# Altium PCB macropad.PcbDoc
Units mm, origin at the board's own origin, x right, y up, seen from the top; angles counter-clockwise.
Board outline 177.4 x 121.16 mm, 2 copper layers (F.Cu, B.Cu); 12 components, 52 nets, 137 pads, 0 vias.
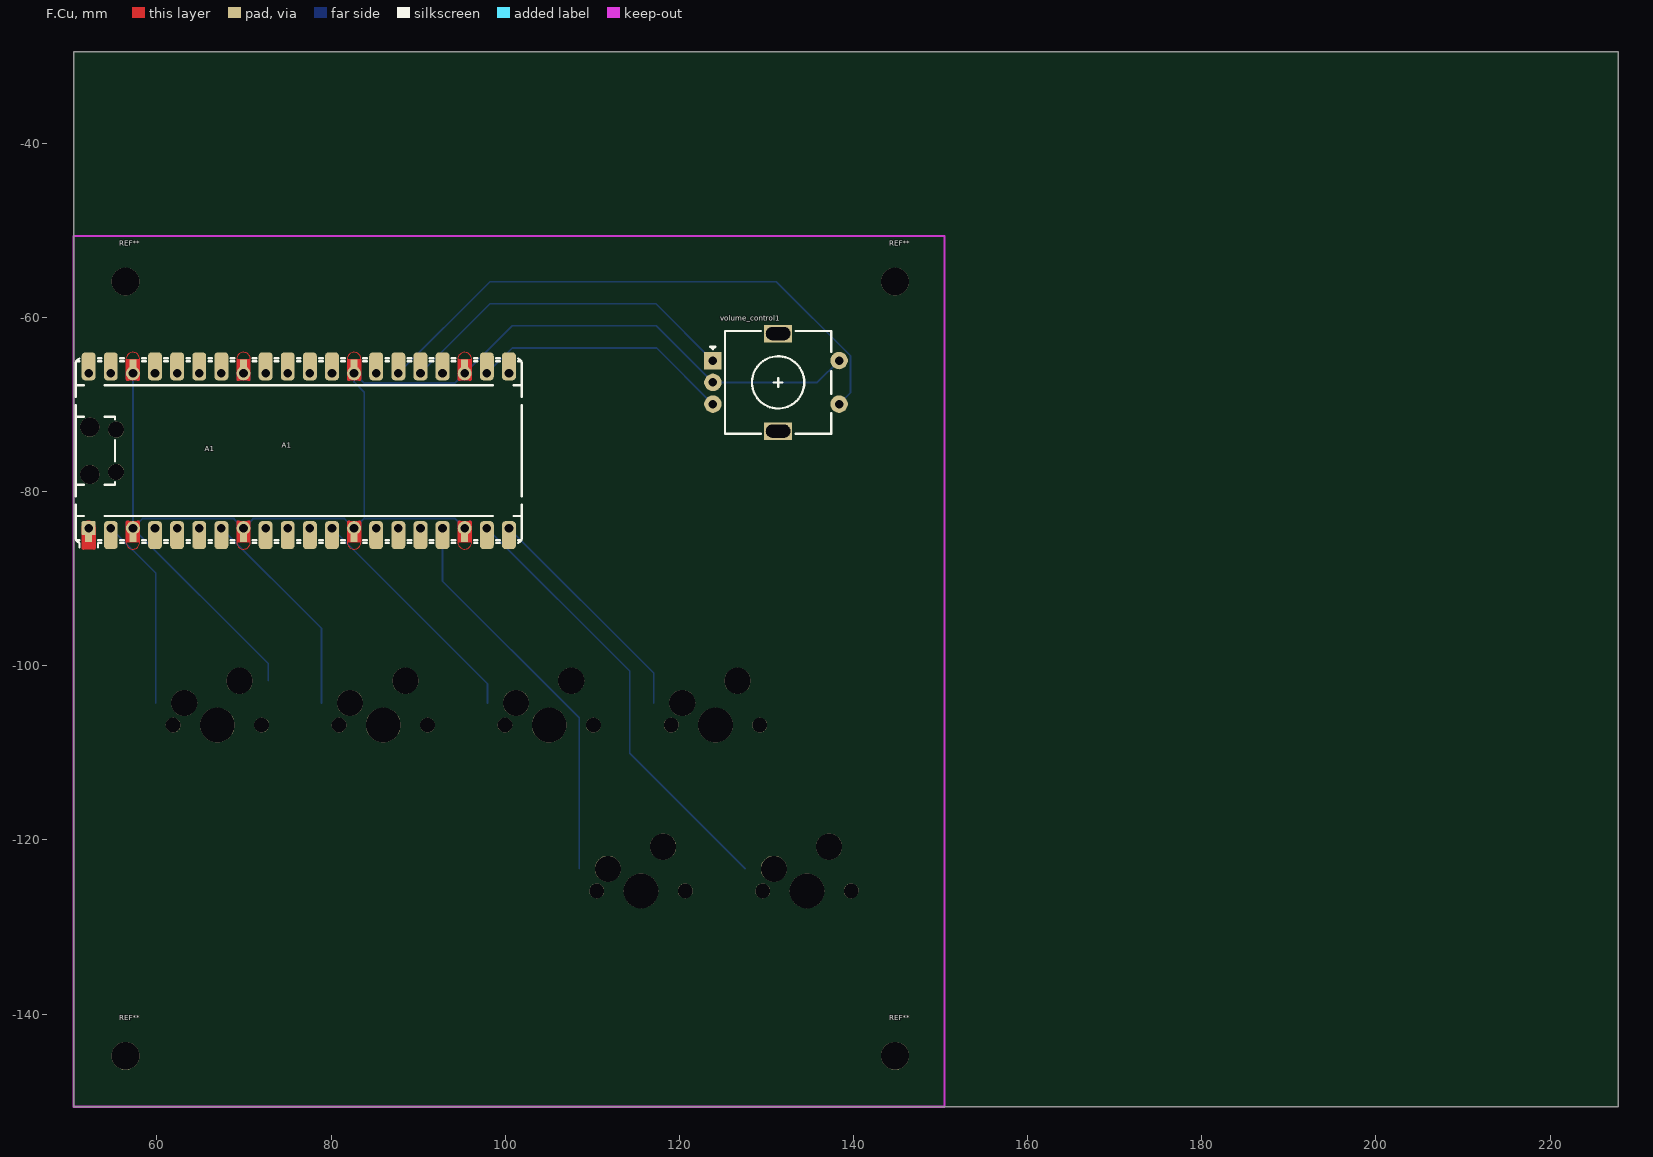
[diagram p0: F.Cu view]
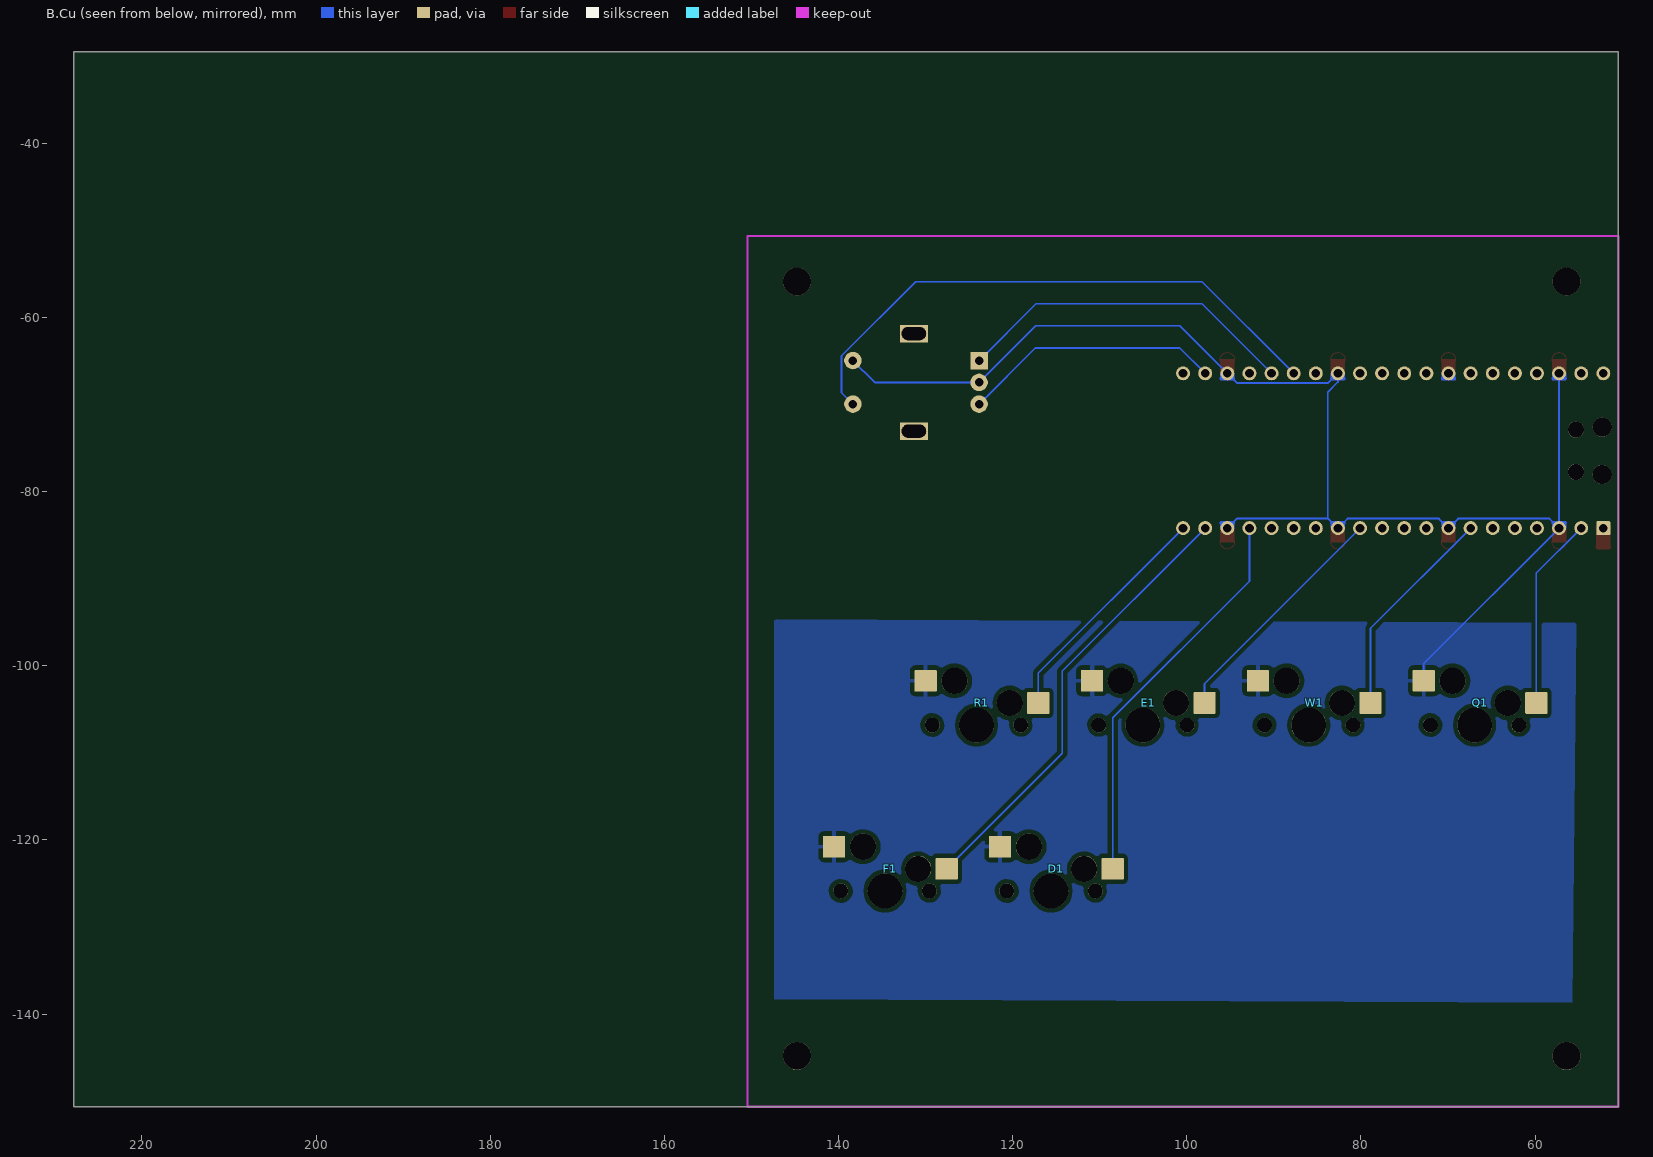
[diagram p1: B.Cu view, seen from below]

## Layer stack, top to bottom
F.Mask: solder mask 0.0102, Solder Resist, Dk 3.5
F.Cu: signal copper 0.0356
Dielectric 1: dielectric 0.32, FR-4, Dk 4.8
B.Cu: signal copper 0.0356
B.Mask: solder mask 0.0102, Solder Resist, Dk 3.5

## Board outline
100.475,-150.622 50.44,-150.622 50.44,-29.464 227.838,-29.464 227.838,-150.622

## Design rules (kind name [scope] priority, off if disabled: settings)
Clearance "Clearence 0.5_Polygon" [InNamedPolygon('B.Cu-GND')] p1: gap=0.5 ignorepadtopadclearanceinfootprint=FALSE
Clearance "Clearence 0.2_NetClass" [InNetClass('Default')] p2: gap=0.2 ignorepadtopadclearanceinfootprint=FALSE
MinimumSolderMaskSliver [All] p1: minsoldermaskwidth=0
PolygonConnect Polygon_B.Cu-GND_ConnectDirect [IsNamedPolygon('B.Cu-GND') vs IsVia] p1: connectstyle=Direct reliefconductorwidth=0.254 reliefentries=4 polygonreliefangle="90 Angle" airgapwidth=0.254
PolygonConnect Polygon_B.Cu-GND_ConnectRelief45 [IsNamedPolygon('B.Cu-GND') vs (IsThruPin or IsSMTPin) and (PadShape_AllLayers = 'Round')] p2: connectstyle=Relief reliefconductorwidth=0.5 reliefentries=4 polygonreliefangle="45 Angle" airgapwidth=0.5
PolygonConnect Polygon_B.Cu-GND_ConnectRelief90 [IsNamedPolygon('B.Cu-GND') vs (IsThruPin or IsSMTPin) and (PadShape_AllLayers <> 'Round')] p3: connectstyle=Relief reliefconductorwidth=0.5 reliefentries=4 polygonreliefangle="90 Angle" airgapwidth=0.5
RoutingVias [All] p1: holewidth=0.711 width=1.27 viastyle="Through Hole" minholewidth=0.711 minwidth=1.27 maxholewidth=0.711 maxwidth=1.27
SilkToSilkClearance [All] p1: silktosilkclearance=0
SilkToSolderMaskClearance [IsPad] p1: minsilkscreentomaskgap=0 clearancetoexposedcopper=TRUE
SolderMaskExpansion [All] p1: expansion=0 istentingtop=FALSE
Width [All] p1: maxlimit=10 minlimit=0.254 preferedwidth=0.254 toplayer_maxwidth=0.254 bottomlayer_prefwidth=0.2 minimp=50.000000 maximp=50.000000 favimp=50.000000
27 further rules are at their usual default settings.

## Classes and differential pairs
net class Default: GND Net-(A1-GPIO9) Net-(A1-GPIO13) Net-(A1-GPIO14) Net-(A1-GPIO15) Net-(A1-GPIO17) Net-(A1-GPIO19) Net-(A1-GPIO20) unconnected-(A1-3V3-Pad36) unconnected-(A1-3V3_EN-Pad37) unconnected-(A1-ADC_VREF-Pad35) unconnected-(A1-ADC_VREF-Pad35)_1 unconnected-(A1-AGND-Pad33) unconnected-(A1-GPIO0-Pad1) unconnected-(A1-GPIO0-Pad1)_1 unconnected-(A1-GPIO1-Pad2) unconnected-(A1-GPIO2-Pad4) unconnected-(A1-GPIO2-Pad4)_1 unconnected-(A1-GPIO3-Pad5) unconnected-(A1-GPIO3-Pad5)_1 unconnected-(A1-GPIO4-Pad6) unconnected-(A1-GPIO4-Pad6)_1 unconnected-(A1-GPIO5-Pad7) unconnected-(A1-GPIO6-Pad9) unconnected-(A1-GPIO6-Pad9)_1 unconnected-(A1-GPIO7-Pad10) unconnected-(A1-GPIO7-Pad10)_1 unconnected-(A1-GPIO8-Pad11) unconnected-(A1-GPIO8-Pad11)_1 unconnected-(A1-GPIO10-Pad14) unconnected-(A1-GPIO10-Pad14)_1 unconnected-(A1-GPIO11-Pad15) unconnected-(A1-GPIO11-Pad15)_1 unconnected-(A1-GPIO12-Pad16) unconnected-(A1-GPIO12-Pad16)_1 unconnected-(A1-GPIO16-Pad21) unconnected-(A1-GPIO16-Pad21)_1 unconnected-(A1-GPIO18-Pad24) unconnected-(A1-GPIO18-Pad24)_1 unconnected-(A1-GPIO21-Pad27) unconnected-(A1-GPIO21-Pad27)_1 unconnected-(A1-GPIO22-Pad29) unconnected-(A1-GPIO22-Pad29)_1 unconnected-(A1-GPIO26_ADC0-Pad31) unconnected-(A1-GPIO26_ADC0-Pad31)_1 unconnected-(A1-GPIO27_ADC1-Pad32) unconnected-(A1-GPIO27_ADC1-Pad32)_1 unconnected-(A1-GPIO28_ADC2-Pad34) unconnected-(A1-GPIO28_ADC2-Pad34)_1 unconnected-(A1-RUN-Pad30) unconnected-(A1-VBUS-Pad40) unconnected-(A1-VSYS-Pad39)

## Components (designator, comment, footprint, x,y, rotation, side; value= is the part's Value field where it differs from the comment)
A1 "Comment" RaspberryPi_Pico_Common_Unspecified 76.3,-75.3 r90 top value=RaspberryPi_Pico
D1 "Comment" MX-Hotswap-1U 115.6,-125.85 r0 bottom value=SW_Push
E1 "Comment" MX-Hotswap-1U 105.05,-106.8 r0 bottom value=SW_Push
F1 "Comment" MX-Hotswap-1U 134.66,-125.85 r0 bottom value=SW_Push
Q1 "Comment" MX-Hotswap-1U 66.95,-106.8 r0 bottom value=SW_Push
R1 "Comment" MX-Hotswap-1U 124.15,-106.8 r0 bottom value=SW_Push
REF** "Comment" MountingHole_3.2mm_M3 56.4,-55.88 r0 top value=MountingHole_3.2mm_M3
REF** "Comment" MountingHole_3.2mm_M3 144.78,-144.78 r0 top value=MountingHole_3.2mm_M3
REF** "Comment" MountingHole_3.2mm_M3 144.78,-55.88 r0 top value=MountingHole_3.2mm_M3
REF** "Comment" MountingHole_3.2mm_M3 56.4,-144.78 r0 top value=MountingHole_3.2mm_M3
volume_control1 "Comment" RotaryEncoder_Alps_EC11E-Switch_Vertical_H20mm 123.85,-64.95 r0 top value=RotaryEncoder_Switch
W1 "Comment" MX-Hotswap-1U 86,-106.8 r0 bottom value=SW_Push

## Footprints (in the part's own frame and the unit in brackets; to place one, negate y for a bottom-side part, rotate by r counter-clockwise, add the part's x,y. Pads: shape width x height; smd on the part's side, far side on the other; paste and mask are expansions set on the pad)
MountingHole_3.2mm_M3 [mm]
  round 3.2 hole 3.2 paste-2539.97 mask+0: Un1(0,0)
MX-Hotswap-1U [mm]
  rrect8% 2.55x2.5 smd mask+0: 1(-7.085,-2.54) 2(5.842,-5.08)
  round 1.702 hole 1.702 paste-2539.97 mask+0: Un1(5.08,0) Un5(-5.08,0)
  round 3 hole 3 paste-2539.97 mask+0: Un2(2.54,-5.08) Un4(-3.81,-2.54)
  round 3.988 hole 3.988 paste-2539.97 mask+0: Un3(0,0)
RaspberryPi_Pico_Common_Unspecified [mm]
  rect 1.6x0.8 smd paste-1.6 mask+0: 1(-9.69,24.13) 3(-9.69,19.05) 8(-9.69,6.35) 13(-9.69,-6.35) 18(-9.69,-19.05) 23(9.69,-19.05) 28(9.69,-6.35) 33(9.69,6.35) 38(9.69,19.05)
  rrect12% 1.6x1.6 hole 1 paste-2539.97 mask+0: 1(-8.89,24.13)
  rrect50% 3.2x1.6 smd paste-3.2 mask+0: 2(-9.69,21.59) 4(-9.69,16.51) 5(-9.69,13.97) 6(-9.69,11.43) 7(-9.69,8.89) 9(-9.69,3.81) 10(-9.69,1.27) 11(-9.69,-1.27) 12(-9.69,-3.81) 14(-9.69,-8.89) 15(-9.69,-11.43) 16(-9.69,-13.97) 17(-9.69,-16.51) 19(-9.69,-21.59) 20(-9.69,-24.13) 21(9.69,-24.13) 22(9.69,-21.59) 24(9.69,-16.51) 25(9.69,-13.97) 26(9.69,-11.43) 27(9.69,-8.89) 29(9.69,-3.81) 30(9.69,-1.27) 31(9.69,1.27) 32(9.69,3.81) 34(9.69,8.89) 35(9.69,11.43) 36(9.69,13.97) 37(9.69,16.51) 39(9.69,21.59) 40(9.69,24.13)
  round 1.6 hole 1 paste-2539.97 mask+0: 2(-8.89,21.59) 3(-8.89,19.05) 4(-8.89,16.51) 5(-8.89,13.97) 6(-8.89,11.43) 7(-8.89,8.89) 8(-8.89,6.35) 9(-8.89,3.81) 10(-8.89,1.27) 11(-8.89,-1.27) 12(-8.89,-3.81) 13(-8.89,-6.35) 14(-8.89,-8.89) 15(-8.89,-11.43) 16(-8.89,-13.97) 17(-8.89,-16.51) 18(-8.89,-19.05) 19(-8.89,-21.59) 20(-8.89,-24.13) 21(8.89,-24.13) 22(8.89,-21.59) 23(8.89,-19.05) 24(8.89,-16.51) 25(8.89,-13.97) 26(8.89,-11.43) 27(8.89,-8.89) 28(8.89,-6.35) 29(8.89,-3.81) 30(8.89,-1.27) 31(8.89,1.27) 32(8.89,3.81) 33(8.89,6.35) 34(8.89,8.89) 35(8.89,11.43) 36(8.89,13.97) 37(8.89,16.51) 38(8.89,19.05) 39(8.89,21.59) 40(8.89,24.13)
  round 2.2 hole 2.2 paste-2539.97 mask+0: Un1(-2.725,24) Un4(2.725,24)
  round 1.85 hole 1.85 paste-2539.97 mask+0: Un2(-2.425,20.97) Un3(2.425,20.97)
  F.Cu circle w0: c8.29,18.45 r0.2
  F.Cu circle w0: c8.29,19.65 r0.2
  F.Cu circle w0: c10.49,19.05 r0.8
  F.Cu circle w0: c8.29,19.65 r0.2
  F.Cu circle w0: c8.29,18.45 r0.2
  F.Cu circle w0: c8.29,5.75 r0.2
  F.Cu circle w0: c8.29,6.95 r0.2
  F.Cu circle w0: c10.49,6.35 r0.8
  F.Cu circle w0: c8.29,6.95 r0.2
  F.Cu circle w0: c8.29,5.75 r0.2
  F.Cu circle w0: c8.29,-6.95 r0.2
  F.Cu circle w0: c8.29,-5.75 r0.2
  F.Cu circle w0: c10.49,-6.35 r0.8
  F.Cu circle w0: c8.29,-5.75 r0.2
  F.Cu circle w0: c8.29,-6.95 r0.2
  F.Cu circle w0: c8.29,-19.65 r0.2
  F.Cu circle w0: c8.29,-18.45 r0.2
  F.Cu circle w0: c10.49,-19.05 r0.8
  F.Cu circle w0: c8.29,-18.45 r0.2
  F.Cu circle w0: c8.29,-19.65 r0.2
  F.Cu circle w0: c-8.29,-18.45 r0.2
  F.Cu circle w0: c-8.29,-19.65 r0.2
  F.Cu circle w0: c-8.29,-19.65 r0.2
  F.Cu circle w0: c-8.29,-18.45 r0.2
  F.Cu circle w0: c-10.49,-19.05 r0.8
  F.Cu circle w0: c-8.29,-5.75 r0.2
  F.Cu circle w0: c-8.29,-6.95 r0.2
  F.Cu circle w0: c-8.29,-6.95 r0.2
  F.Cu circle w0: c-8.29,-5.75 r0.2
  F.Cu circle w0: c-10.49,-6.35 r0.8
  F.Cu circle w0: c-8.29,6.95 r0.2
  F.Cu circle w0: c-8.29,5.75 r0.2
  F.Cu circle w0: c-8.29,5.75 r0.2
  F.Cu circle w0: c-8.29,6.95 r0.2
  F.Cu circle w0: c-10.49,6.35 r0.8
  F.Cu circle w0: c-8.29,19.65 r0.2
  F.Cu circle w0: c-8.29,18.45 r0.2
  F.Cu circle w0: c-8.29,18.45 r0.2
  F.Cu circle w0: c-8.29,19.65 r0.2
  F.Cu circle w0: c-10.49,19.05 r0.8
  F.Cu circle w0: c-11.09,23.53 r0.2
  F.Cu circle w0: c-11.09,24.73 r0.2
  F.Cu circle w0: c-8.89,24.13 r0.8
  F.Cu region: 10.49,18.25 8.29,18.25 8.09,18.45 8.09,19.65 8.29,19.85 10.49,19.85
  F.Cu region: 8.89,18.25 8.29,18.25 8.09,18.45 8.09,19.65 8.29,19.85 8.89,19.85
  F.Cu region: 10.49,5.55 8.29,5.55 8.09,5.75 8.09,6.95 8.29,7.15 10.49,7.15
  F.Cu region: 8.89,5.55 8.29,5.55 8.09,5.75 8.09,6.95 8.29,7.15 8.89,7.15
  F.Cu region: 10.49,-7.15 8.29,-7.15 8.09,-6.95 8.09,-5.75 8.29,-5.55 10.49,-5.55
  F.Cu region: 8.89,-7.15 8.29,-7.15 8.09,-6.95 8.09,-5.75 8.29,-5.55 8.89,-5.55
  F.Cu region: 10.49,-19.85 8.29,-19.85 8.09,-19.65 8.09,-18.45 8.29,-18.25 10.49,-18.25
  F.Cu region: 8.89,-19.85 8.29,-19.85 8.09,-19.65 8.09,-18.45 8.29,-18.25 8.89,-18.25
  F.Cu region: -8.09,-18.45 -8.09,-19.65 -8.29,-19.85 -8.89,-19.85 -8.89,-18.25 -8.29,-18.25
  F.Cu region: -8.09,-18.45 -8.09,-19.65 -8.29,-19.85 -10.49,-19.85 -10.49,-18.25 -8.29,-18.25
  F.Cu region: -8.09,-5.75 -8.09,-6.95 -8.29,-7.15 -8.89,-7.15 -8.89,-5.55 -8.29,-5.55
  F.Cu region: -8.09,-5.75 -8.09,-6.95 -8.29,-7.15 -10.49,-7.15 -10.49,-5.55 -8.29,-5.55
  F.Cu region: -8.09,6.95 -8.09,5.75 -8.29,5.55 -8.89,5.55 -8.89,7.15 -8.29,7.15
  F.Cu region: -8.09,6.95 -8.09,5.75 -8.29,5.55 -10.49,5.55 -10.49,7.15 -8.29,7.15
  F.Cu region: -8.09,19.65 -8.09,18.45 -8.29,18.25 -8.89,18.25 -8.89,19.85 -8.29,19.85
  F.Cu region: -8.09,19.65 -8.09,18.45 -8.29,18.25 -10.49,18.25 -10.49,19.85 -8.29,19.85
  F.Cu region: -8.89,23.33 -11.09,23.33 -11.29,23.53 -11.29,24.73 -11.09,24.93 -8.89,24.93
  B.Cu circle w0: c8.29,19.65 r0.2
  B.Cu circle w0: c8.29,18.45 r0.2
  B.Cu circle w0: c8.29,6.95 r0.2
  B.Cu circle w0: c8.29,5.75 r0.2
  B.Cu circle w0: c8.29,-5.75 r0.2
  B.Cu circle w0: c8.29,-6.95 r0.2
  B.Cu circle w0: c8.29,-18.45 r0.2
  B.Cu circle w0: c8.29,-19.65 r0.2
  B.Cu circle w0: c-8.29,-18.45 r0.2
  B.Cu circle w0: c-8.29,-19.65 r0.2
  B.Cu circle w0: c-8.29,-5.75 r0.2
  B.Cu circle w0: c-8.29,-6.95 r0.2
  B.Cu circle w0: c-8.29,6.95 r0.2
  B.Cu circle w0: c-8.29,5.75 r0.2
  B.Cu circle w0: c-8.29,19.65 r0.2
  B.Cu circle w0: c-8.29,18.45 r0.2
  B.Cu region: 8.89,18.25 8.29,18.25 8.09,18.45 8.09,19.65 8.29,19.85 8.89,19.85
  B.Cu region: 8.89,5.55 8.29,5.55 8.09,5.75 8.09,6.95 8.29,7.15 8.89,7.15
  B.Cu region: 8.89,-7.15 8.29,-7.15 8.09,-6.95 8.09,-5.75 8.29,-5.55 8.89,-5.55
  B.Cu region: 8.89,-19.85 8.29,-19.85 8.09,-19.65 8.09,-18.45 8.29,-18.25 8.89,-18.25
  B.Cu region: -8.09,-18.45 -8.09,-19.65 -8.29,-19.85 -8.89,-19.85 -8.89,-18.25 -8.29,-18.25
  B.Cu region: -8.09,-5.75 -8.09,-6.95 -8.29,-7.15 -8.89,-7.15 -8.89,-5.55 -8.29,-5.55
  B.Cu region: -8.09,6.95 -8.09,5.75 -8.29,5.55 -8.89,5.55 -8.89,7.15 -8.29,7.15
  B.Cu region: -8.09,19.65 -8.09,18.45 -8.29,18.25 -8.89,18.25 -8.89,19.85 -8.29,19.85
  silkscreen extent -11.09,-25.61 10.61,25.61
RotaryEncoder_Alps_EC11E-Switch_Vertical_H20mm [mm]
  rect 2x2 hole 1 paste-2539.97 mask+0: A(0,0)
  round 2 hole 1 paste-2539.97 mask+0: B(0,-5) C(0,-2.5) S1(14.5,-5) S2(14.5,0)
  rect 3.2x2 hole 1.5 slot 2.8 at 0 deg paste-2539.97 mask+0: MP(7.5,-8.1) MP(7.5,3.1)
  silkscreen extent -0.3,-8.4 13.6,3.4

## Part data
A1: library part RaspberryPi_Pico_Common_Unspecified, "Raspberry Pi Pico versatile common (Pico & Pico W) footprint for surface-mount or through-hole hand soldering, supports Raspberry Pi Pico 2, default socketed model has height of 8.51mm, https://datasheets.raspberrypi.com/pico/pico-datasheet.pdf", Datasheet=https://datasheets.raspberrypi.com/pico/pico-datasheet.pdf, Description="Versatile and inexpensive microcontroller module powered by RP2040 dual-core Arm Cortex-M0+ processor up to 133 MHz, 264kB SRAM, 2MB QSPI flash; also supports Raspberry Pi Pico 2", ki_fp_filters="RaspberryPi?Pico?Common* RaspberryPi?Pico?SMD*"
D1 E1 F1 Q1 R1 W1: library part MX-Hotswap-1U, Description="Push button switch, generic, two pins"
REF** REF** REF** REF**: library part MountingHole_3.2mm_M3, "Mounting Hole 3.2mm, M3, no annular, generated by kicad-footprint-generator mountinghole.py", KiLib_Generator=mounting_hardware/mounting_hole
volume_control1: library part RotaryEncoder_Alps_EC11E-Switch_Vertical_H20mm, "Alps rotary encoder, EC11E... with switch, vertical shaft, http://www.alps.com/prod/info/E/HTML/Encoder/Incremental/EC11/EC11E15204A3.html", Description="Rotary encoder, dual channel, incremental quadrate outputs, with switch", ki_fp_filters=RotaryEncoder*Switch*

## Nets (pads, with @x,y where several pads share a name; then routed paths per layer and width w, separated by ;. In a path a pad name is that pad's centre, name@x,y a point inside that pad or via, vN(x,y) a via of type N, cw(c..) or ccw(c..) an arc to the next point about the centre after c; other vN are vias at no path point)
GND: A1.3 A1.8 A1.13 A1.18 A1.23 A1.28 A1.38 D1.2 E1.2 F1.2 Q1.2 R1.2 volume_control1.C volume_control1.S2 W1.2 | length 164.1
  B.Cu w0.2: A1.38@57.25,-66.41 A1.3@57.25,-84.19 ; Q1.2 72.792,-99.732 A1.3@57.25,-84.19 ; A1.18@95.35,-84.19 94.25,-83.09 83.75,-83.09 ; volume_control1.C@123.79,-67.51 volume_control1.C ; volume_control1.S2 135.85,-67.45 volume_control1.C ; A1.3@57.25,-84.19 58.35,-83.09 68.85,-83.09 69.95,-84.19 71.05,-83.09 81.55,-83.09 A1.13@82.65,-84.19 ; A1.13@82.65,-84.19 83.75,-83.09 ; A1.13@82.65,-84.19 83.82,-83.02 ; 83.75,-83.09 83.82,-83.02 ; 83.82,-83.02 83.82,-68.58 82.65,-67.41 82.65,-66.41 83.75,-67.51 94.25,-67.51 95.35,-66.41 100.8,-60.96 117.36,-60.96 volume_control1.C
Net-(A1-GPIO9): A1.12 E1.1 | length 27.5
  B.Cu w0.2: A1.12@80.11,-84.19 97.965,-102.045 E1.1
Net-(A1-GPIO13): A1.17 D1.1 | length 45.6
  B.Cu w0.2: A1.17@92.81,-84.19 92.81,-90.27 108.515,-105.975 D1.1
Net-(A1-GPIO14): A1.19 F1.1 | length 51.4
  B.Cu w0.2: A1.19@97.89,-84.19 114.3,-100.6 114.3,-110.035 F1.1
Net-(A1-GPIO15): A1.20 R1.1 | length 27
  B.Cu w0.2: A1.20@100.43,-84.19 117.065,-100.825 R1.1
Net-(A1-GPIO17): A1.22 volume_control1.B | length 29.8
  B.Cu w0.2: A1.22@97.89,-66.41 100.8,-63.5 117.4,-63.5 volume_control1.B
Net-(A1-GPIO19): A1.25 volume_control1.A | length 39.6
  B.Cu w0.2: A1.25@90.27,-66.41 98.26,-58.42 117.32,-58.42 volume_control1.A
Net-(A1-GPIO20): A1.26 volume_control1.S1 | length 65.9
  B.Cu w0.2: A1.26@87.73,-66.41 98.26,-55.88 131.118,-55.88 139.65,-64.412 139.65,-68.65 volume_control1.S1
unconnected-(A1-3V3-Pad36): A1.36
unconnected-(A1-3V3_EN-Pad37): A1.37
unconnected-(A1-ADC_VREF-Pad35): A1.35@64.87,-66.41
unconnected-(A1-ADC_VREF-Pad35)_1: A1.35@64.87,-65.61
unconnected-(A1-AGND-Pad33): A1.33
unconnected-(A1-GPIO0-Pad1): A1.1@52.17,-84.99
unconnected-(A1-GPIO0-Pad1)_1: A1.1@52.17,-84.19
unconnected-(A1-GPIO1-Pad2): A1.2 Q1.1 | length 22.2
  B.Cu w0.2: A1.2@54.71,-84.19 59.865,-89.345 Q1.1
unconnected-(A1-GPIO2-Pad4): A1.4@59.79,-84.99
unconnected-(A1-GPIO2-Pad4)_1: A1.4@59.79,-84.19
unconnected-(A1-GPIO3-Pad5): A1.5@62.33,-84.19
unconnected-(A1-GPIO3-Pad5)_1: A1.5@62.33,-84.99
unconnected-(A1-GPIO4-Pad6): A1.6@64.87,-84.99
unconnected-(A1-GPIO4-Pad6)_1: A1.6@64.87,-84.19
unconnected-(A1-GPIO5-Pad7): A1.7 W1.1 | length 24.8
  B.Cu w0.2: A1.7@67.41,-84.19 78.915,-95.695 W1.1
unconnected-(A1-GPIO6-Pad9): A1.9@72.49,-84.99
unconnected-(A1-GPIO6-Pad9)_1: A1.9@72.49,-84.19
unconnected-(A1-GPIO7-Pad10): A1.10@75.03,-84.19
unconnected-(A1-GPIO7-Pad10)_1: A1.10@75.03,-84.99
unconnected-(A1-GPIO8-Pad11): A1.11@77.57,-84.19
unconnected-(A1-GPIO8-Pad11)_1: A1.11@77.57,-84.99
unconnected-(A1-GPIO10-Pad14): A1.14@85.19,-84.19
unconnected-(A1-GPIO10-Pad14)_1: A1.14@85.19,-84.99
unconnected-(A1-GPIO11-Pad15): A1.15@87.73,-84.19
unconnected-(A1-GPIO11-Pad15)_1: A1.15@87.73,-84.99
unconnected-(A1-GPIO12-Pad16): A1.16@90.27,-84.99
unconnected-(A1-GPIO12-Pad16)_1: A1.16@90.27,-84.19
unconnected-(A1-GPIO16-Pad21): A1.21@100.43,-66.41
unconnected-(A1-GPIO16-Pad21)_1: A1.21@100.43,-65.61
unconnected-(A1-GPIO18-Pad24): A1.24@92.81,-66.41
unconnected-(A1-GPIO18-Pad24)_1: A1.24@92.81,-65.61
unconnected-(A1-GPIO21-Pad27): A1.27@85.19,-65.61
unconnected-(A1-GPIO21-Pad27)_1: A1.27@85.19,-66.41
unconnected-(A1-GPIO22-Pad29): A1.29@80.11,-66.41
unconnected-(A1-GPIO22-Pad29)_1: A1.29@80.11,-65.61
unconnected-(A1-GPIO26_ADC0-Pad31): A1.31@75.03,-65.61
unconnected-(A1-GPIO26_ADC0-Pad31)_1: A1.31@75.03,-66.41
unconnected-(A1-GPIO27_ADC1-Pad32): A1.32@72.49,-65.61
unconnected-(A1-GPIO27_ADC1-Pad32)_1: A1.32@72.49,-66.41
unconnected-(A1-GPIO28_ADC2-Pad34): A1.34@67.41,-66.41
unconnected-(A1-GPIO28_ADC2-Pad34)_1: A1.34@67.41,-65.61
unconnected-(A1-RUN-Pad30): A1.30
unconnected-(A1-VBUS-Pad40): A1.40
unconnected-(A1-VSYS-Pad39): A1.39
pads on no net: A1.Un1 A1.Un2 A1.Un3 A1.Un4 D1.Un1 D1.Un2 D1.Un3 D1.Un4 D1.Un5 E1.Un1 E1.Un2 E1.Un3 E1.Un4 E1.Un5 F1.Un1 F1.Un2 F1.Un3 F1.Un4 F1.Un5 Q1.Un1 Q1.Un2 Q1.Un3 Q1.Un4 Q1.Un5 R1.Un1 R1.Un2 R1.Un3 R1.Un4 R1.Un5 REF**.Un1 volume_control1.MP W1.Un1 W1.Un2 W1.Un3 W1.Un4 W1.Un5

## Polygon pours and split planes (outlines as drawn)
GND on B.Cu "B.Cu-GND" (solid, remove dead copper, pour order 0): 55.293,-95.049 147.35,-94.657 147.35,-138.304 55.725,-138.696

## Keep-outs
Edge.Cuts:
  lines w0: 50.44,-150.64 150.44,-150.64 150.44,-50.64 50.44,-50.64 50.44,-150.64
  lines w0.254: 50.44,-150.64 150.44,-150.64 150.44,-50.64 50.44,-50.64 50.44,-150.64

## Silkscreen, mask and mechanical layers (free items; w line width, h text height)
F.SilkS:
  text "A1" at 65.525,-75.579 h1

## Text inside footprints (layer, text, board x,y; h text height)
A1: Cmts.User "Exposed Copper Keep Out" at 100.062,-76.076 h0.33 r90; Cmts.User "Keep Out" at 97.14,-76.116 h1 r90; Cmts.User "Possible Antenna" at 91.656,-77.394 h1 r90; Cmts.User "Exposed Copper Keep Out" at 80.997,-72.952 h0.33 r90; Cmts.User "Out" at 70.9,-74.167 h0.33 r90; Cmts.User "Keep" at 70.295,-74.206 h0.33 r90; Cmts.User "Copper" at 69.662,-74.3 h0.33 r90; Cmts.User "AGND Plane" at 66.837,-70.097 h0.5; Cmts.User "Exposed Copper Keep Out" at 59.878,-77.661 h0.33; Cmts.User "Out" at 54.583,-75.167 h0.33 r90; Cmts.User "Keep" at 53.978,-75.206 h0.33 r90; Cmts.User "Copper" at 51.314,-75.3 h0.33 r90; Cmts.User "Exposed" at 50.678,-75.338 h0.33 r90; Cmts.User "Keep Out" at 39.355,-76.116 h1 r90; Cmts.User "USB Cable" at 26.656,-75.578 h1 r90